# Altium PCB board.PcbDoc
Units mm, origin at the board's own origin, x right, y up, seen from the top; angles counter-clockwise.
Board outline 114.5 x 62 mm, 2 copper layers (Top Layer, Bottom Layer), stack 0.97 mm thick; 49 components, 37 nets, 122 pads, 0 vias.
Unrouted connection lines stored in the file: 6.
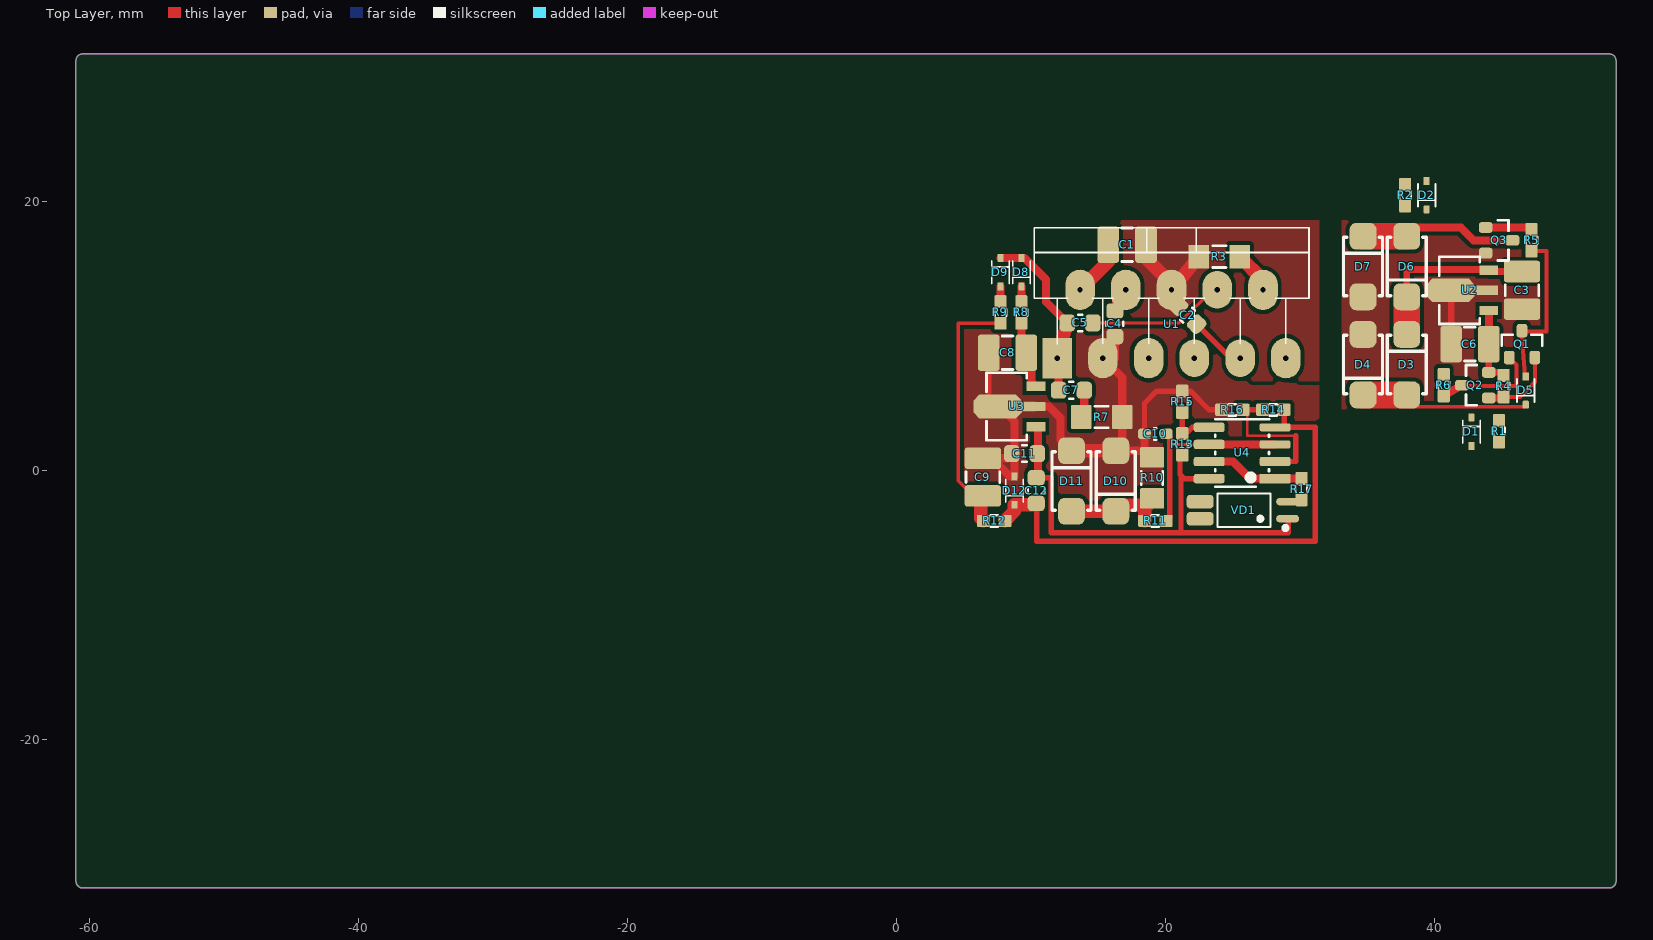
[diagram p0: Top Layer view]
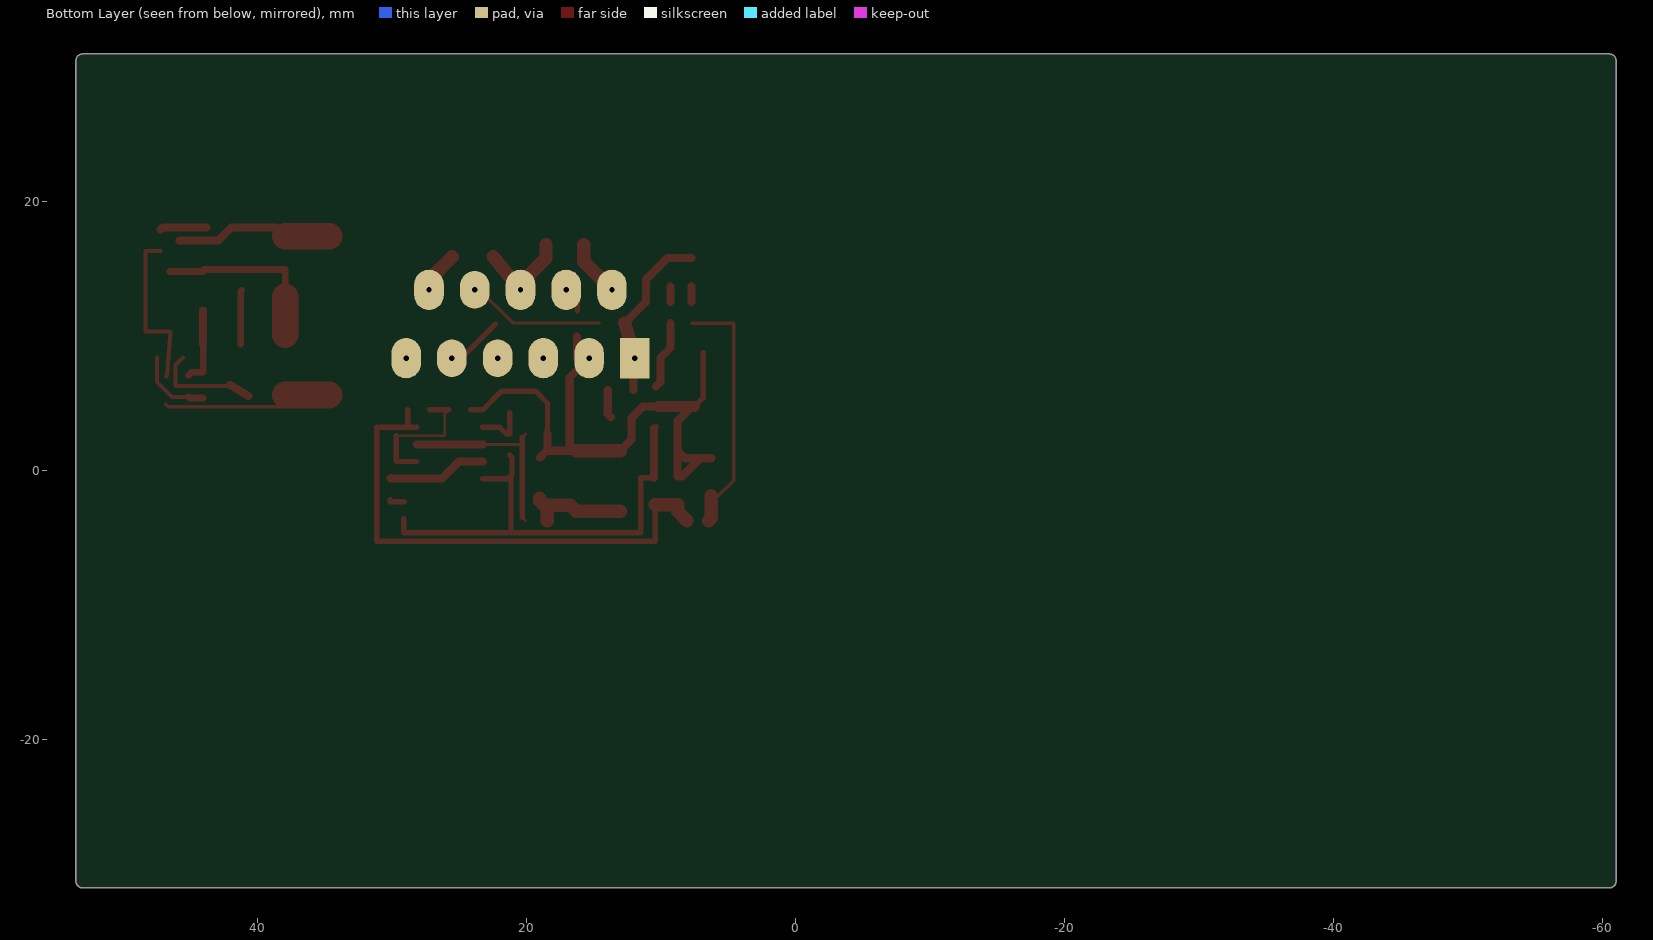
[diagram p1: Bottom Layer view, seen from below]
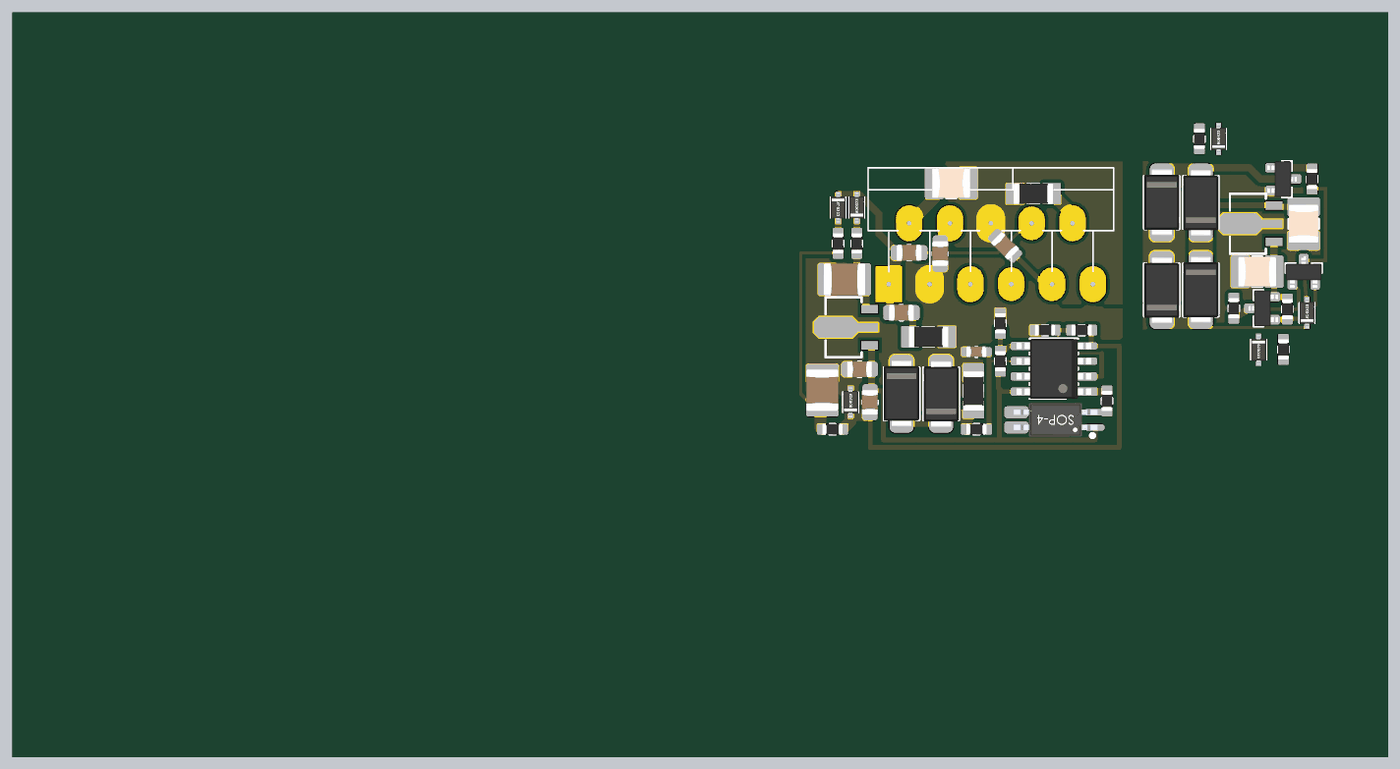
[diagram p2: 3D render of the assembled board from above, using the file's embedded part models]

## Layer stack, top to bottom
Top Solder: solder mask 0.0127, Solder Resist, Dk 3.8
Top Layer: signal copper 0.035
Dielectric: core 0.9, FR-4, Dk 4.5
Bottom Layer: signal copper 0.035
Bottom Solder: solder mask 0.0127, Solder Resist, Dk 3.8

## Board outline
-61,-30.5 ccw(c-60.5,-30.5) -60.5,-31 53,-31 ccw(c53,-30.5) 53.5,-30.5 53.5,30.5 ccw(c53,30.5) 53,31 -60.5,31 ccw(c-60.5,30.5) -61,30.5

## Design rules (kind name [scope] priority, off if disabled: settings)
AcuteAngle [All] p1: minimum=6.00000000000000E+0001 checktracksonly=FALSE
BoardOutlineClearance [All] p1: gap=0.3 ignorepadtopadclearanceinfootprint=FALSE
Clearance Clearance_1 [All] p1: gap=0.3 ignorepadtopadclearanceinfootprint=FALSE except(0.13: Arc-Arc Arc-Track Arc-SMDPad Arc-Via Track-Track Track-SMDPad Track-Via SMDPad-SMDPad SMDPad-Via THPad-Via Via-Via; 0.15: Arc-THPad Arc-Text Arc-Hole Track-THPad Track-Text Track-Hole SMDPad-THPad SMDPad-Text SMDPad-Hole THPad-THPad THPad-Text THPad-Hole Via-Text Via-Hole Fill-Text Fill-Hole Poly-Text Poly-Hole Region-Text Region-Hole Text-Text Text-Hole)
ComponentClearance ComponentClearance_1 [IsFree] p1: gap=-1 collisioncheckmode=3 verticalgap=2540 showdistances=FALSE
ComponentClearance [All] p2: gap=0.3 collisioncheckmode=3 verticalgap=0.254 showdistances=FALSE donotcheckwithout3dbody=TRUE
Height [All] p1: minheight=0 maxheight=500 prefheight=12.7
HoleSize [All] p1: absolutevalues=TRUE maxlimit=6 minlimit=0.2 maxpercent=80.000 minpercent=20.000
HoleToHoleClearance HoleToHoleClearance_1 [IsVia vs IsThruPin] p1: gap=0.7 allowstackedmicrovias=TRUE
HoleToHoleClearance [All] p2: gap=0.5 allowstackedmicrovias=TRUE
MinimumSolderMaskSliver [All] p1 off: minsoldermaskwidth=0.254
PlaneClearance [All] p1: clearance=0.45
PlaneConnect [All] p1: planeconnectstyle=Direct reliefexpansion=0.3 reliefentries=4 reliefconductorwidth=0.381 reliefairgap=0.178
PolygonConnect [All] p1: connectstyle=Direct reliefconductorwidth=0.381 reliefentries=4 polygonreliefangle="90 Angle" airgapwidth=0.356
RoutingVias [All] p1: holewidth=0.3 width=0.6 viastyle="Through Hole" minholewidth=0.2 minwidth=0.45 maxholewidth=0.9 maxwidth=1.27
SilkToSilkClearance [All] p1 off: silktosilkclearance=0.254
SilkToSolderMaskClearance [IsPad] p1 off: minsilkscreentomaskgap=0.254 clearancetoexposedcopper=TRUE
SolderMaskExpansion [All] p1: expansion=0.102 istentingtop=FALSE
SupplyNets "Schematic Supply Nets_5" [InNet('3V3')] p1: voltage=0.000
SupplyNets "Schematic Supply Nets_4" [InNet('GND0')] p2: voltage=0.000
SupplyNets "Schematic Supply Nets_2" [InNet('Vb0')] p3: voltage=0.000
SupplyNets "Schematic Supply Nets_3" [InNet('Vb')] p4: voltage=0.000
SupplyNets "Schematic Supply Nets" [InNet('5V')] p5: voltage=0.000
SupplyNets "Schematic Supply Nets_1" [InNet('GND')] p6: voltage=0.000
UnRoutedNet [All] p1: checkbadconnections=TRUE
Width [All] p1: maxlimit=3.81 minlimit=0.14 preferedwidth=0.254
20 further rules are at their usual default settings.

## Classes and differential pairs
component class board: C1 C2 C3 C4 C5 C6 C7 C8 C9 C10 C11 C12 D1 D3 D7 D9 D11 D12 Q1 Q2 Q3 R1 R3 R5 R8 R10 R13 R15 R17 U1 U2 U3 U4 VD1

## Components (designator, comment, footprint, x,y, rotation, side; value= is the part's Value field where it differs from the comment)
C1 "4n7" C1210-2.5MM 17.153,16.814 r0 top
C2 "4n7" C0805 21.641,11.582 r135 top
C3 "4n7" C1210-2.5MM 46.507,13.425 r270 top
C4 "15n" C0805 16.236,10.938 r270 top
C5 "15n" C0805 13.651,10.998 r180 top
C6 "4n7" C1210-2.5MM 42.639,9.425 r180 top
C7 "4n7" C0805 13.008,6 r0 top
C8 "2u" C1210-1.8MM 8.262,8.786 r180 top
C9 "2u" C1210-1.8MM 6.422,-0.46 r270 top
C10 "4n7" C0603 19.25,2.75 r180 top
C11 "10u" C0805 9.52,1.29 r180 top
C12 "10u" C0805 10.393,-1.46 r270 top
D1 "1N4148WS" SOD-323 42.748,2.921 r270 top
D2 "1N4148WS" SOD-323 39.421,20.498 r90 top
D3 "1N4148WS" SMA 37.939,7.904 r90 top
D4 "1N4148WS" SMA 34.689,7.904 r270 top
D5 "1N4148WS" SOD-323 46.787,5.98 r90 top
D6 "1N4148WS" SMA 37.939,15.193 r270 top
D7 "1N4148WS" SMA 34.689,15.193 r90 top
D8 "1N4148WS" SOD-323 9.29,14.778 r90 top
D9 "1N4148WS" SOD-323 7.734,14.778 r270 top
D10 "SS36" SMA 16.312,-0.75 r270 top
D11 "SS36" SMA 13.016,-0.75 r90 top
D12 "1N4148WS" SOD-323 8.77,-1.46 r90 top
Q1 "Bipolar PNP 3 Pins Transistor Gummel-Poon Model" SOT-23 46.507,9.425 r270 top
Q2 "Bipolar PNP 3 Pins Transistor Gummel-Poon Model" SOT-23 43.039,6.375 r0 top
Q3 "MMBT2222" SOT-23 44.806,17.145 r180 top
R1 "" R0603 44.806,2.946 r90 top
R2 "" R0603 37.821,20.498 r270 top
R3 "" R1206 24,15.924 r180 top
R4 "" R0603 45.138,6.308 r270 top
R5 "" R0603 47.219,17.145 r90 top
R6 "" R0603 40.689,6.375 r90 top
R7 "" R1206 15.262,4 r0 top
R8 "33" R0603 9.29,11.778 r270 top
R9 "220" R0603 7.734,11.778 r270 top
R10 "" R1206 19.008,-0.521 r270 top
R11 "1k" R0603 19.25,-3.71 r180 top
R12 "220" R0603 7.27,-3.71 r0 top
R13 "270k" R0603 21.25,1.968 r270 top
R14 "33k" R0603 28.017,4.547 r0 top
R15 "1k" R0603 21.25,5.128 r90 top
R16 "820" R0603 24.968,4.547 r180 top
R17 "" R0603 30.124,-1.346 r270 top
U1 "L6203" MULTIWATT-11V_L19.6-W5.0-P1.70-L 20.451,10.922 r0 top
U2 "7805" SOT-89 42.614,13.425 r90 top
U3 "7805" SOT-89 8.945,4.79 r90 top
U4 "LM393" SO-8 25.7,1.333 r90 top
VD1 "EL3H4(A)(TA)-VG" SOP-4_L4.4-W2.8-P1.27-LS7.0-TL 25.832,-2.921 r180 top

## Footprints (in the part's own frame and the unit in brackets; to place one, negate y for a bottom-side part, rotate by r counter-clockwise, add the part's x,y. Pads: shape width x height; smd on the part's side, far side on the other; paste and mask are expansions set on the pad)
C0603 [mil] "Chip Capacitor"
  rrect50% 38x31 smd mask+1.97: 1(-31.5,0) 2(31.5,0)
  silkscreen extent -3,-17 3,17, body extent -33,-18 33,18, height 35
C0805 [mil] "Chip Capacitor"
  rrect50% 45x50 smd mask+1.97: 1(-37.5,0) 2(37.5,0)
  silkscreen extent -6,-25 6,25, body extent -41,-27 41,27, height 53
C1210-1.8MM [mm] "Chip Capacitor"
  rrect25% 1.6x2.7 smd mask+0.05: 1(-1.4,0) 2(1.4,0)
  silkscreen extent -0.4,-1.25 0.4,1.25, body extent -1.75,-1.35 1.75,1.35, height 1.8
C1210-2.5MM [mm] "Chip Capacitor"
  rrect25% 1.6x2.7 smd mask+0.05: 1(-1.4,0) 2(1.4,0)
  silkscreen extent -0.4,-1.25 0.4,1.25, body extent -1.6,-1.25 1.6,1.25, height 2.52
MULTIWATT-11V_L19.6-W5.0-P1.70-L [mm]
  rect 2.2x3 hole 0.4: 1(-8.5,-2.54)
  oval 2.2x3 hole 0.4 copper offset 0.001,0: 2(-6.801,2.54) 5(-1.7,-2.54)
  oval 2.2x3 hole 0.4 copper offset -0.001,0: 3(-5.099,-2.54) 6(0.001,2.54) 10(6.801,2.54)
  oval 2.2x3 hole 0.4: 4(-3.4,2.54) 11(8.5,-2.54)
  oval 2.2x2.8 hole 0.4 copper offset -0.001,0: 7(1.701,-2.54)
  oval 2.2x2.8 hole 0.4: 8(3.4,2.54)
  oval 2.2x2.8 hole 0.4 copper offset 0.001,0: 9(5.099,-2.54)
  silkscreen extent -10.22,-1.49 10.22,7.16
R0603 [mil] "Chip Resistor; Body 1.6 x 0.8 mm (LxW typ)"
  rrect20% 38x35.43 smd mask+1.97: 1(-31.5,0) 2(31.5,0)
  silkscreen extent -10,-17 10,17, body extent -33,-18 33,18, height 22
R1206 [mil] "Chip Resistor"
  rrect10% 60x70 smd mask+1.97: 1(-60,0) 2(60,0)
  silkscreen extent -20,-31 20,31, body extent -65,-33 65,33, height 26
SMA [mm] "SMA(DO-214AC)"
  rrect50% 2x2 smd: 1(-2.25,0) 2(2.25,0)
  silkscreen extent -2.17,-1.45 2.17,1.45, body extent -2.78,-1.48 2.83,1.48, height 2.9
SO-8 [mm] "SOIC, 8-Leads, Body 4.9x3.9mm, Pitch 1.27mm, IPC Low Density"
  rect 0.7x2.3 smd mask+0.05: 1(-1.905,-2.45)
  rrect50% 0.7x2.3 smd mask+0.05: 2(-0.635,-2.45) 5(1.905,2.45) 6(0.635,2.45) 7(-0.635,2.45) 8(-1.905,2.45)
  rrect50% 0.6x2.3 smd mask+0.05: 3(0.635,-2.45) 4(1.905,-2.45)
  silkscreen extent -2.5,-2 2.5,2, body extent -2.5,-3.1 2.5,3.1, height 1.75
SOD-323 [mm]
  rect 0.59x0.45 smd mask+0.05: 1(1.055,0)
  rrect30% 0.59x0.45 smd mask+0.05: 2(-1.055,0)
  silkscreen extent -0.85,-0.65 0.85,0.65, body extent -1.25,-0.63 1.25,0.62, height 0.99
SOP-4_L4.4-W2.8-P1.27-LS7.0-TL [mm]
  oval 1.71x0.56 smd mask+0.05: 1(-3.255,0.635) 2(-3.255,-0.635)
  rrect50% 2x1 smd mask+0.05: 3(3.255,-0.635) 4(3.255,0.635)
  silkscreen extent -3.24,-1.25 1.97,1.47, body extent -3.5,-1.4 3.5,1.4, height 2.1
SOT-23 [mm]
  rrect50% 1x0.8 smd mask+0.05: 1(1,-0.95) 2(1,0.95) 3(-1,0)
  silkscreen extent -0.7,-1.5 0.1,1.5, body extent -1.27,-1.5 1.33,1.5, height 1.1
SOT-89 [mm] "SOT-89; Body 4.7 x 4.5 mm, inc. leads (LxW max)"
  rect 0.7x1.4 smd: 1(-1.5,-1.425) 3(1.5,-1.425)
  oct 1.75x3.6 smd: 2(0,1.425)
  rect 0.7x1.75 smd: 2(0,-1.25)
  silkscreen extent -2.5,-0.75 2.5,2.25, body extent -2.25,-0.6 2.25,1.85, height 1.5

## Part data
C1 C2 C3 C4 C5 C6 C7 C10: library part CAP, "4n7 0402"
C8 C9 C11 C12: library part CAP
D1 D2 D3 D4 D5 D6 D7 D8 D9 D10 D11 D12: library part NCP51460SN33T1G, LCSC part number=C693617, P/N=SMCJ24A
Q1 Q2: library part "BJT PNP GP"
Q3: library part MMBT2222ALT1G, LCSC part number=C82460, P/N=MMBT2222ALT1G
R1 R2 R3 R4 R5 R6 R7 R8 R9 R10 R11 R12 R13 R14 R15 R16 R17: library part RES, LCSC part number=C138044, P/N=RC0402FR-0718KL
U1: JLCPCB Part Class="Extended Part", LCSC Part Name=48V电机驱动芯片, Manufacturer=ST(意法半导体), Add into BOM=yes, Convert to PCB=yes, Datasheet=https://atta.szlcsc.com/upload/public/pdf/source/20180808/C262899_7890AA609047E1172E0679C1326478CF.pdf, Device=L6203, Manufacturer Part=L6203, Supplier=LCSC, Supplier Footprint=Multiwatt-11-V, Supplier Part=C34306, Symbol=L6203
U2 U3: library part Component_4_1, "XC6206P332MR"

## Nets (pads, with @x,y where several pads share a name; then routed paths per layer and width w, separated by ;. In a path a pad name is that pad's centre, name@x,y a point inside that pad or via, vN(x,y) a via of type N, cw(c..) or ccw(c..) an arc to the next point about the centre after c; other vN are vias at no path point)
3V3: D1.2 D2.2
5V: C6.1 Q2.2 R4.1 U2.1 | length 5.8
  Top Layer w0.5: C6.1 Q2.2 44.921,7.325 R4.1
  Top Layer w0.6: C6.1 U2.1
DCC1: D1.1 R1.1
DCC2: D2.1 R2.1
EN: U1.11
GND: C3.2 C6.2 D4.1 D7.1 Q3.2 U2.2 | length 4
  Top Layer w0.5: U2.2@41.189,13.425 41.239,13.375 C6.2
GND0: C1.2 C2.2 R3.2 U1.6 VD1.3 | length 7.3
  Top Layer w1: C1.2 18.553,15.82 20.452,13.921 U1.6 R3.2
IN1: U1.5
IN2: U1.7
NetC2_1: C2.1 U1.9 | length 4.6
  Top Layer w0.4: C2.1 24.841,8.382 U1.9
  Top Layer w1: U1.9 U1.9@25.756,8.176
NetC4_1: C4.1 U1.4 | length 2.4
  Top Layer w0.4: C4.1 16.236,13.462 U1.4
NetC5_1: C5.1 U1.8 | length 10.3
  Top Layer w0.25: C5.1 21.043,10.998 23.507,13.462 U1.8
NetC7_2: C7.2 R7.1 | length 2.1
  Top Layer w0.6: R7.1 13.961,4.222 C7.2
NetC8_1: C8.1 R8.2 U3.3 | length 5.1
  Top Layer w0.6: R8.2 9.29,9.158 C8.1 10.039,8.409 10.039,6.621 U3.3
NetC9_2: C9.2 R9.2 R12.1 | length 18.9
  Top Layer w0.25: C9.2@6.27,-1.86 5.732,-1.86 4.607,-0.735 4.607,10.978 R9.2
  Top Layer w1: C9.2@6.27,-1.86 6.27,-3.51 R12.1
NetC10_1: C10.1 R11.1 U4.3 U4.6 | length 15.4
  Top Layer w0.2: R11.1 R11.1@20.308,-3.453 ; C10.1@20.308,2.493 C10.1 20.242,2.558 20.378,2.422 20.378,1.968 U4.6
  Top Layer w0.4: R11.1@20.308,-3.453 C10.1@20.308,2.493
  Top Layer w0.6: U4.6 U4.3
NetC11_1: C11.1 C12.1 R13.2 U3.1 U4.8 VD1.1 | length 35.7
  Top Layer w0.4: U3.1 U3.1@10.52,3.14 ; C12.1@10.52,-0.508 11.507,-0.508 11.507,-4.597 21.157,-4.597 ; 21.157,-0.342 21.157,-4.597 ; R13.2 21.082,1 21.082,-0.267 21.387,-0.572 U4.8 ; VD1.1@29.138,-3.556 29.138,-4.597 21.157,-4.597
  Top Layer w0.6: C12.1@10.52,-0.508 U3.1@10.52,3.14
NetC12_2: C12.2 D12.2 R12.2 R14.2 U4.4 | length 39.3
  Top Layer w0.4: C12.2@10.417,-2.515 10.417,-5.232 31.14,-5.232 31.14,3.238 U4.4@28.817,3.238 ; U4.4 U4.4@28.817,3.238 ; R14.2 U4.4@28.817,3.238
  Top Layer w1: R12.2 8.77,-3.01 D12.2 C12.2@10.417,-2.515
NetD3_1: D3.1 D4.2 D5.2 R1.2 | length 12.2
  Top Layer w0.25: D3.1@37.939,4.766 46.628,4.766 D5.2@46.83,4.968
  Top Layer w2: D4.2 D3.1
NetD5_1: D5.1 Q1.3 R5.1 | length 12.3
  Top Layer w0.3: D5.1 46.727,7.086 46.456,10.365 48.336,10.365 48.336,16.345 R5.1
NetD6_1: D6.1 D7.2 Q3.3 R2.2 | length 11.8
  Top Layer w0.6: D6.1 38.593,18.098 41.957,18.098 42.91,17.145 Q3.3
  Top Layer w2: D7.2 D6.1
NetD8_2: D8.2 R8.1 | length 1.1
  Top Layer w0.6: R8.1 D8.2
NetD9_1: D9.1 R9.1 | length 1.1
  Top Layer w0.6: R9.1 D9.1
NetQ1_1: Q1.1 Q2.3 R6.1 | length 8
  Top Layer w0.3: Q2.3 42.039,6.308 46.091,6.308 46.091,7.892 Q1.1
  Top Layer w0.6: R6.1 Q2.3
NetQ1_2: Q1.2 Q2.1 R4.2 | length 5.7
  Top Layer w0.3: R4.2 46.351,5.508 47.457,6.614 Q1.2
  Top Layer w0.5: Q2.1 45.055,5.425 R4.2
NetQ3_1: Q3.1 R5.2 | length 3.5
  Top Layer w0.6: Q3.1 46.857,18.095 cw(c46.857,17.583) R5.2
NetR3_1: R3.1 U1.10 | length 3.2
  Top Layer w1: R3.1 27.252,14.196 U1.10
NetR13_1: R13.1 R15.1 U4.5 | length 3.8
  Top Layer w0.4: R15.1 R13.1 21.523,2.768 21.993,3.238 U4.5
NetR14_1: R14.1 R16.1 U4.2 | length 10.6
  Top Layer w0.2: R16.1 26.076,4.239 26.076,2.615 29.693,2.615
  Top Layer w0.4: R16.1 R14.1 ; U4.2 29.693,0.698 29.693,2.615
NetR17_1: R17.1 U4.1 U4.7 | length 7.2
  Top Layer w0.6: U4.7 25.015,0.698 26.285,-0.572 U4.1@27.94,-0.572 ; U4.1 30.124,-0.572 R17.1
NetR17_2: R17.2 VD1.2 | length 1.2
  Top Layer w0.4: VD1.2 30.124,-2.286 R17.2
OUT1: C5.2 C7.1 D8.1 D9.2 U1.1 | length 13.1
  Top Layer w0.6: D9.2 D8.1 9.516,15.833 11.125,14.224 11.125,12.571 C5.2 ; U1.1 12.056,8.277 C7.1
  Top Layer w1: U1.1 C5.2
OUT2: D10.2 D11.1 R10.2 R11.2 | length 8.7
  Top Layer w1: D11.1 D10.2 16.747,-2.565 18.45,-2.565 R11.2 18.45,-2.769 19.008,-2.211 R10.2
UART: R6.2
Vb: C3.1 D3.2 D6.2 U2.3 | length 13.4
  Top Layer w0.5: D6.2 37.939,14.979 43.985,14.979 U2.3 ; U2.3@44.039,14.825 C3.1
  Top Layer w2: D3.2 D6.2
Vb0: C1.1 U1.2 | length 4.2
  Top Layer w1: U1.2 15.753,15.565 C1.1
VGND: C4.2 C8.2 C9.1 C10.2 C11.2 D10.1 D11.2 D12.1 R7.2 R10.1 R15.2 R16.2 U1.3 U3.2 | length 50
  Top Layer w0.4: C8.2 6.862,5.448 U3.2@7.52,4.79 ; C10.2 18.45,3.14 18.44,3.15 18.44,5.029 19.339,5.928 R15.2 21.86,5.928 23.241,4.547 R16.2
  Top Layer w0.6: U3.2@7.52,4.79 7.692,4.79 8.77,3.712 8.77,1.29 D12.1 8.436,-0.405 7.258,0.773 C9.1@7.091,0.94 ; C11.2 8.218,0.94 7.425,0.94 C9.1@7.091,0.94 ; U3.2@10.195,4.79 11.339,4.79 12.192,3.937 12.192,2.324 D11.2 ; C4.2 16.236,8.382 U1.3 16.786,6.948 R7.2 16.786,1.974 D10.1 R10.1@18.511,1.5 ; C10.2 18.45,1.561 R10.1@18.511,1.5 ; R10.1 R10.1@18.511,1.5 ; C9.1@7.091,0.94 6.27,0.94 C9.1@7.091,0.94
  Top Layer w0.8: U3.2@7.52,4.79 U3.2@10.195,4.79
  Top Layer w1: D11.2 D10.1
pads on no net: VD1.4

## Polygon pours and split planes (outlines as drawn)
VGND on Top Layer "VGND_L01_P002" (solid, remove dead copper, pour order 2): 29.21,6.528 29.21,6.706 19.19,16.726 4.47,16.726 4.47,-5.41 31.42,-5.41 31.42,6.528
GND0 on Top Layer "GND0_L01_P001" (solid, remove dead copper, pour order 1): 4.47,18.618 31.42,18.618 31.42,6.68 19.456,6.68 11.303,14.834 4.47,14.834
GND on Top Layer "GND_L01_P000" (solid, remove dead copper, pour order 0): 33.122,4.597 48.565,4.597 48.565,18.644 33.122,18.644

## Keep-outs
Keep-Out Layer:
  the board outline again, w0

## Silkscreen, mask and mechanical layers (free items; w line width, h text height)
Board Shape:
  the board outline again, w0